# Altium PCB sk-am62-package-placement.PcbDoc
Units mm, origin at the board's own origin, x right, y up, seen from the top; angles counter-clockwise.
Board outline 22.86 x 24.13 mm, 2 copper layers (Top, Bottom), stack 0 mm thick; 2 components, 302 nets, 425 pads, 0 vias.
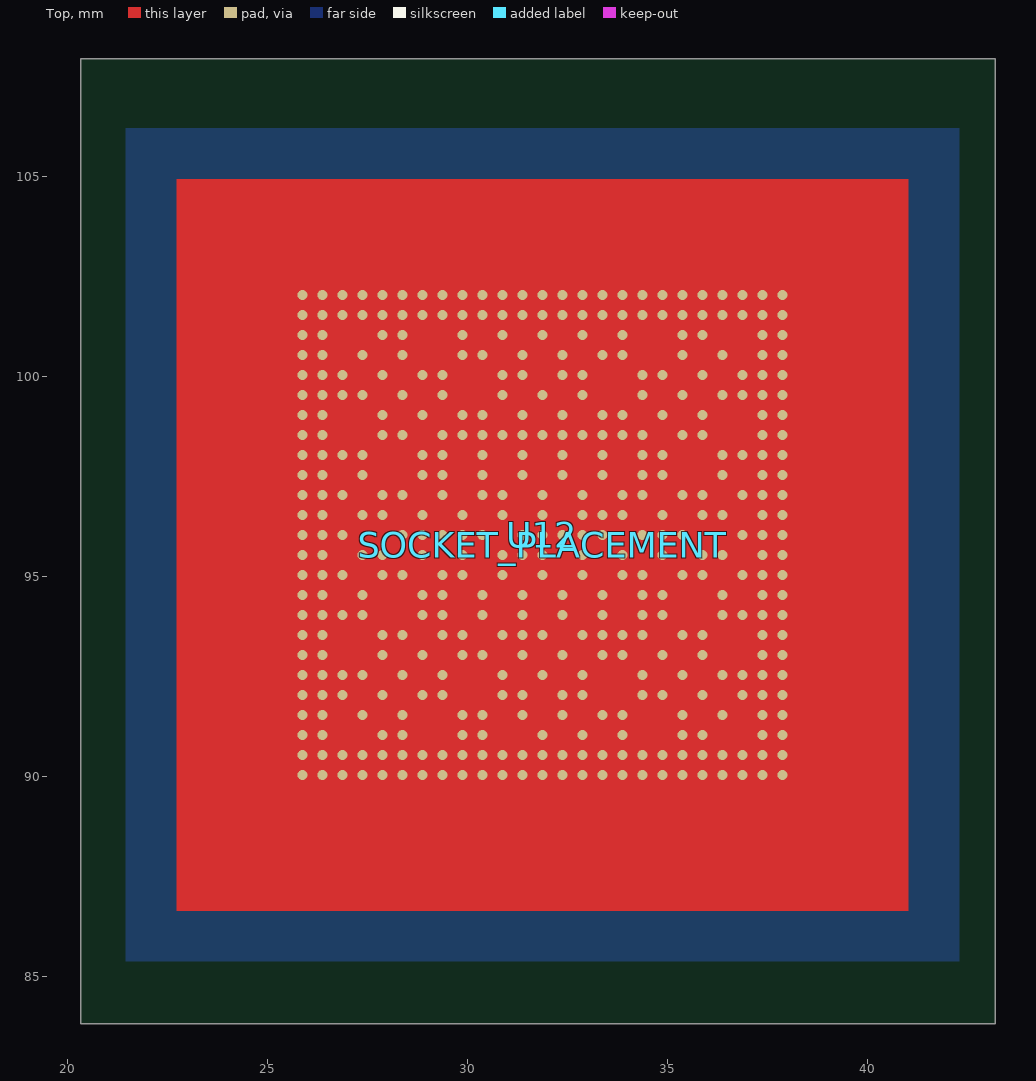
[diagram p0: Top view]
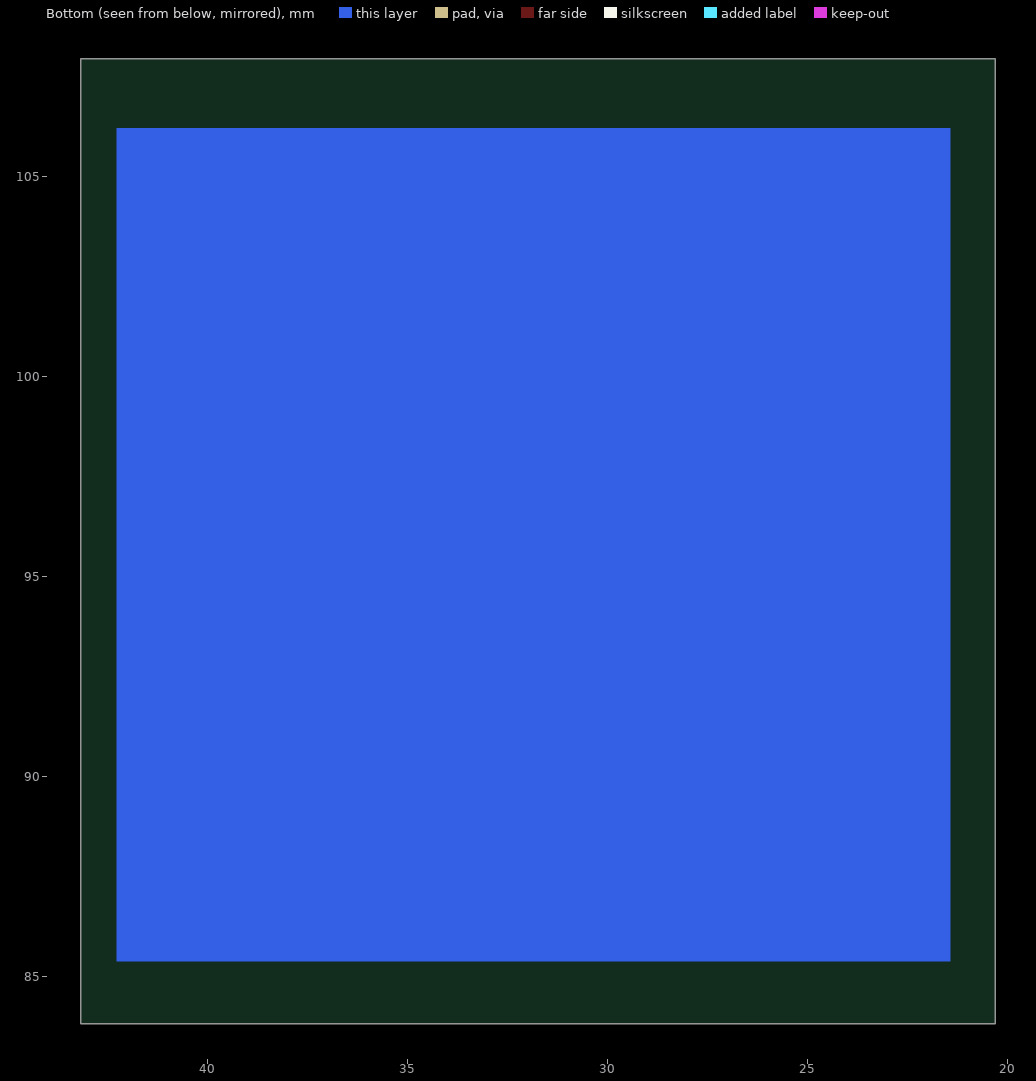
[diagram p1: Bottom view, seen from below]

## Layer stack, top to bottom

## Board outline
20.32,83.82 43.18,83.82 43.18,107.95 20.32,107.95

## Components (designator, comment, footprint, x,y, rotation, side; value= is the part's Value field where it differs from the comment)
SOCKET_PLACEMENT "" BGASKT425_C21135_720X720_9-7 31.863,95.798 r90 top
U12 "" BGA425_19-68_510X510_0-7 31.86,96.045 r90 top

## Footprints (in the part's own frame and the unit in brackets; to place one, negate y for a bottom-side part, rotate by r counter-clockwise, add the part's x,y. Pads: shape width x height; smd on the part's side, far side on the other; paste and mask are expansions set on the pad)
BGA425_19-68_510X510_0-7 [mil] "BGA425_19-68_510X510_0-7"
  round 10 smd: A1(-236.22,236.22) A2(-216.54,236.22) A3(-196.85,236.22) A4(-177.16,236.22) A5(-157.48,236.22) A6(-137.8,236.22) A7(-118.11,236.22) A8(-98.42,236.22) A9(-78.74,236.22) A10(-59.06,236.22) A11(-39.37,236.22) A12(-19.68,236.22) A13(0,236.22) A14(19.68,236.22) A15(39.37,236.22) A16(59.06,236.22) A17(78.74,236.22) A18(98.42,236.22) A19(118.11,236.22) A20(137.8,236.22) A21(157.48,236.22) A22(177.16,236.22) A23(196.85,236.22) A24(216.54,236.22) A25(236.22,236.22) AA1(-236.22,-157.48) AA2(-216.54,-157.48) AA3(-196.85,-157.48) AA5(-157.48,-157.48) AA7(-118.11,-157.48) AA8(-98.42,-157.48) AA11(-39.37,-157.48) AA12(-19.68,-157.48) AA14(19.68,-157.48) AA15(39.37,-157.48) AA18(98.42,-157.48) AA19(118.11,-157.48) AA21(157.48,-157.48) AA23(196.85,-157.48) AA24(216.54,-157.48) AA25(236.22,-157.48) AB1(-236.22,-177.16) AB2(-216.54,-177.16) AB4(-177.16,-177.16) AB6(-137.8,-177.16) AB9(-78.74,-177.16) AB10(-59.06,-177.16) AB12(-19.68,-177.16) AB14(19.68,-177.16) AB16(59.06,-177.16) AB17(78.74,-177.16) AB20(137.8,-177.16) AB22(177.16,-177.16) AB24(216.54,-177.16) AB25(236.22,-177.16) AC1(-236.22,-196.85) AC2(-216.54,-196.85) AC5(-157.48,-196.85) AC6(-137.8,-196.85) AC9(-78.74,-196.85) AC11(-39.37,-196.85) AC13(0,-196.85) AC15(39.37,-196.85) AC17(78.74,-196.85) AC20(137.8,-196.85) AC21(157.48,-196.85) AC24(216.54,-196.85) AC25(236.22,-196.85) AD1(-236.22,-216.54) AD2(-216.54,-216.54) AD3(-196.85,-216.54) AD4(-177.16,-216.54) AD5(-157.48,-216.54) AD6(-137.8,-216.54) AD7(-118.11,-216.54) AD8(-98.42,-216.54) AD9(-78.74,-216.54) AD10(-59.06,-216.54) AD11(-39.37,-216.54) AD12(-19.68,-216.54) AD13(0,-216.54) AD14(19.68,-216.54) AD15(39.37,-216.54) AD16(59.06,-216.54) AD17(78.74,-216.54) AD18(98.42,-216.54) AD19(118.11,-216.54) AD20(137.8,-216.54) AD21(157.48,-216.54) AD22(177.16,-216.54) AD23(196.85,-216.54) AD24(216.54,-216.54) AD25(236.22,-216.54) AE1(-236.22,-236.22) AE2(-216.54,-236.22) AE3(-196.85,-236.22) AE4(-177.16,-236.22) AE5(-157.48,-236.22) AE6(-137.8,-236.22) AE7(-118.11,-236.22) AE8(-98.42,-236.22) AE9(-78.74,-236.22) AE10(-59.06,-236.22) AE11(-39.37,-236.22) AE12(-19.68,-236.22) AE13(0,-236.22) AE14(19.68,-236.22) AE15(39.37,-236.22) AE16(59.06,-236.22) AE17(78.74,-236.22) AE18(98.42,-236.22) AE19(118.11,-236.22) AE20(137.8,-236.22) AE21(157.48,-236.22) AE22(177.16,-236.22) AE23(196.85,-236.22) AE24(216.54,-236.22) AE25(236.22,-236.22) B1(-236.22,216.54) B2(-216.54,216.54) B3(-196.85,216.54) B4(-177.16,216.54) B5(-157.48,216.54) B6(-137.8,216.54) B7(-118.11,216.54) B8(-98.42,216.54) B9(-78.74,216.54) B10(-59.06,216.54) B11(-39.37,216.54) B12(-19.68,216.54) B13(0,216.54) B14(19.68,216.54) B15(39.37,216.54) B16(59.06,216.54) B17(78.74,216.54) B18(98.42,216.54) B19(118.11,216.54) B20(137.8,216.54) B21(157.48,216.54) B22(177.16,216.54) B23(196.85,216.54) B24(216.54,216.54) B25(236.22,216.54) C1(-236.22,196.85) C2(-216.54,196.85) C5(-157.48,196.85) C6(-137.8,196.85) C9(-78.74,196.85) C11(-39.37,196.85) C13(0,196.85) C15(39.37,196.85) C17(78.74,196.85) C20(137.8,196.85) C21(157.48,196.85) C24(216.54,196.85) C25(236.22,196.85) D1(-236.22,177.16) D2(-216.54,177.16) D4(-177.16,177.16) D6(-137.8,177.16) D9(-78.74,177.16) D10(-59.06,177.16) D12(-19.68,177.16) D14(19.68,177.16) D16(59.06,177.16) D17(78.74,177.16) D20(137.8,177.16) D22(177.16,177.16) D24(216.54,177.16) D25(236.22,177.16) E1(-236.22,157.48) E2(-216.54,157.48) E3(-196.85,157.48) E5(-157.48,157.48) E7(-118.11,157.48) E8(-98.42,157.48) E11(-39.37,157.48) E12(-19.68,157.48) E14(19.68,157.48) E15(39.37,157.48) E18(98.42,157.48) E19(118.11,157.48) E21(157.48,157.48) E23(196.85,157.48) E24(216.54,157.48) E25(236.22,157.48) F1(-236.22,137.8) F2(-216.54,137.8) F3(-196.85,137.8) F4(-177.16,137.8) F6(-137.8,137.8) F8(-98.42,137.8) F11(-39.37,137.8) F13(0,137.8) F15(39.37,137.8) F18(98.42,137.8) F20(137.8,137.8) F22(177.16,137.8) F23(196.85,137.8) F24(216.54,137.8) F25(236.22,137.8) G1(-236.22,118.11) G2(-216.54,118.11) G5(-157.48,118.11) G7(-118.11,118.11) G9(-78.74,118.11) G10(-59.06,118.11) G12(-19.68,118.11) G13(0,118.11) G14(19.68,118.11) G16(59.06,118.11) G17(78.74,118.11) G19(118.11,118.11) G21(157.48,118.11) G24(216.54,118.11) G25(236.22,118.11) H1(-236.22,98.42) H2(-216.54,98.42) H5(-157.48,98.42) H6(-137.8,98.42) H8(-98.42,98.42) H9(-78.74,98.42) H10(-59.06,98.42) H11(-39.37,98.42) H13(0,98.42) H15(39.37,98.42) H16(59.06,98.42) H17(78.74,98.42) H18(98.42,98.42) H20(137.8,98.42) H21(157.48,98.42) H24(216.54,98.42) H25(236.22,98.42) J1(-236.22,78.74) J2(-216.54,78.74) J3(-196.85,78.74) J4(-177.16,78.74) J7(-118.11,78.74) J8(-98.42,78.74) J11(-39.37,78.74) J12(-19.68,78.74) J13(0,78.74) J14(19.68,78.74) J18(98.42,78.74) J19(118.11,78.74) J22(177.16,78.74) J23(196.85,78.74) J24(216.54,78.74) J25(236.22,78.74) K1(-236.22,59.06) K2(-216.54,59.06) K3(-196.85,59.06) K4(-177.16,59.06) K7(-118.11,59.06) K9(-78.74,59.06) K10(-59.06,59.06) K13(0,59.06) K15(39.37,59.06) K16(59.06,59.06) K17(78.74,59.06) K18(98.42,59.06) K19(118.11,59.06) K22(177.16,59.06) K24(216.54,59.06) K25(236.22,59.06) L1(-236.22,39.37) L2(-216.54,39.37) L5(-157.48,39.37) L6(-137.8,39.37) L8(-98.42,39.37) L11(-39.37,39.37) L12(-19.68,39.37) L14(19.68,39.37) L15(39.37,39.37) L18(98.42,39.37) L20(137.8,39.37) L21(157.48,39.37) L23(196.85,39.37) L24(216.54,39.37) L25(236.22,39.37) M1(-236.22,19.68) M2(-216.54,19.68) M4(-177.16,19.68) M5(-157.48,19.68) M7(-118.11,19.68) M8(-98.42,19.68) M9(-78.74,19.68) M10(-59.06,19.68) M12(-19.68,19.68) M13(0,19.68) M16(59.06,19.68) M17(78.74,19.68) M18(98.42,19.68) M19(118.11,19.68) M21(157.48,19.68) M22(177.16,19.68) M24(216.54,19.68) M25(236.22,19.68) N1(-236.22,0) N2(-216.54,0) N3(-196.85,0) N6(-137.8,0) N8(-98.42,0) N11(-39.37,0) N12(-19.68,0) N13(0,0) N14(19.68,0) N15(39.37,0) N18(98.42,0) N20(137.8,0) N23(196.85,0) N24(216.54,0) N25(236.22,0) P1(-236.22,-19.68) P2(-216.54,-19.68) P4(-177.16,-19.68) P5(-157.48,-19.68) P7(-118.11,-19.68) P9(-78.74,-19.68) P10(-59.06,-19.68) P13(0,-19.68) P16(59.06,-19.68) P17(78.74,-19.68) P18(98.42,-19.68) P19(118.11,-19.68) P21(157.48,-19.68) P22(177.16,-19.68) P24(216.54,-19.68) P25(236.22,-19.68) R1(-236.22,-39.37) R2(-216.54,-39.37) R3(-196.85,-39.37) R5(-157.48,-39.37) R6(-137.8,-39.37) R8(-98.42,-39.37) R11(-39.37,-39.37) R12(-19.68,-39.37) R13(0,-39.37) R14(19.68,-39.37) R15(39.37,-39.37) R18(98.42,-39.37) R20(137.8,-39.37) R21(157.48,-39.37) R23(196.85,-39.37) R24(216.54,-39.37) R25(236.22,-39.37) T1(-236.22,-59.06) T2(-216.54,-59.06) T4(-177.16,-59.06) T7(-118.11,-59.06) T8(-98.42,-59.06) T9(-78.74,-59.06) T10(-59.06,-59.06) T13(0,-59.06) T14(19.68,-59.06) T16(59.06,-59.06) T17(78.74,-59.06) T18(98.42,-59.06) T19(118.11,-59.06) T22(177.16,-59.06) T24(216.54,-59.06) T25(236.22,-59.06) U1(-236.22,-78.74) U2(-216.54,-78.74) U3(-196.85,-78.74) U4(-177.16,-78.74) U7(-118.11,-78.74) U8(-98.42,-78.74) U11(-39.37,-78.74) U12(-19.68,-78.74) U14(19.68,-78.74) U15(39.37,-78.74) U18(98.42,-78.74) U19(118.11,-78.74) U22(177.16,-78.74) U23(196.85,-78.74) U24(216.54,-78.74) U25(236.22,-78.74) V1(-236.22,-98.42) V2(-216.54,-98.42) V5(-157.48,-98.42) V6(-137.8,-98.42) V8(-98.42,-98.42) V9(-78.74,-98.42) V10(-59.06,-98.42) V11(-39.37,-98.42) V13(0,-98.42) V15(39.37,-98.42) V16(59.06,-98.42) V17(78.74,-98.42) V18(98.42,-98.42) V20(137.8,-98.42) V21(157.48,-98.42) V24(216.54,-98.42) V25(236.22,-98.42) W1(-236.22,-118.11) W2(-216.54,-118.11) W5(-157.48,-118.11) W7(-118.11,-118.11) W9(-78.74,-118.11) W10(-59.06,-118.11) W12(-19.68,-118.11) W13(0,-118.11) W14(19.68,-118.11) W16(59.06,-118.11) W17(78.74,-118.11) W19(118.11,-118.11) W21(157.48,-118.11) W24(216.54,-118.11) W25(236.22,-118.11) Y1(-236.22,-137.8) Y2(-216.54,-137.8) Y3(-196.85,-137.8) Y4(-177.16,-137.8) Y6(-137.8,-137.8) Y8(-98.42,-137.8) Y11(-39.37,-137.8) Y13(0,-137.8) Y15(39.37,-137.8) Y18(98.42,-137.8) Y20(137.8,-137.8) Y22(177.16,-137.8) Y23(196.85,-137.8) Y24(216.54,-137.8) Y25(236.22,-137.8)
BGASKT425_C21135_720X720_9-7 [mm] "BGASKT425_C21135_720X720_9-7"
  Top region: -9.144,9.144 -9.144,-9.144 9.144,-9.144 9.144,9.144
  Bottom region: -10.414,10.414 -10.414,-10.414 10.414,-10.414 10.414,10.414

## Nets (pads, with @x,y where several pads share a name; then routed paths per layer and width w, separated by ;. In a path a pad name is that pad's centre, name@x,y a point inside that pad or via, vN(x,y) a via of type N, cw(c..) or ccw(c..) an arc to the next point about the centre after c; other vN are vias at no path point)
BT_EN_SOC: U12.E8
CAP_VDDS0: U12.H15
CAP_VDDS1: U12.K18
CAP_VDDS2: U12.W17
CAP_VDDS3: U12.P19
CAP_VDDS4: U12.U7
CAP_VDDS5: U12.H17
CAP_VDDS6: U12.J19
CAP_VDDS_CANUART: U12.G9
CAP_VDDS_MCU: U12.H11
CH1_LVDS_A0N: U12.AA5
CH1_LVDS_A0P: U12.Y6
CH1_LVDS_A1N: U12.AD3
CH1_LVDS_A1P: U12.AB4
CH1_LVDS_A2N: U12.Y8
CH1_LVDS_A2P: U12.AA8
CH1_LVDS_A3N: U12.AB6
CH1_LVDS_A3P: U12.AA7
CH1_LVDS_CLKN: U12.AD4
CH1_LVDS_CLKP: U12.AE3
CH2_LVDS_A0N: U12.AC6
CH2_LVDS_A0P: U12.AC5
CH2_LVDS_A1N: U12.AE5
CH2_LVDS_A1P: U12.AD6
CH2_LVDS_A2N: U12.AE6
CH2_LVDS_A2P: U12.AD7
CH2_LVDS_A3N: U12.AD8
CH2_LVDS_A3P: U12.AE7
CH2_LVDS_CLKN: U12.AE4
CH2_LVDS_CLKP: U12.AD5
CPSW_RGMII1_RD0: U12.AB17
CPSW_RGMII1_RD1: U12.AC17
CPSW_RGMII1_RD2: U12.AB16
CPSW_RGMII1_RD3: U12.AA15
CPSW_RGMII1_RX_CTL: U12.AE17
CPSW_RGMII1_RXC: U12.AD17
CPSW_RGMII1_TD0: U12.AE20
CPSW_RGMII1_TD1: U12.AD20
CPSW_RGMII1_TD2: U12.AE18
CPSW_RGMII1_TD3: U12.AD18
CPSW_RGMII1_TX_CTL: U12.AD19
CPSW_RGMII2_RD0: U12.AE23
CPSW_RGMII2_RD1: U12.AB20
CPSW_RGMII2_RD2: U12.AC21
CPSW_RGMII2_RD3: U12.AE22
CPSW_RGMII2_RX_CTL: U12.AD22
CPSW_RGMII2_RXC: U12.AD23
CPSW_RGMII2_TD0: U12.Y18
CPSW_RGMII2_TD1: U12.AA18
CPSW_RGMII2_TD2: U12.AD21
CPSW_RGMII2_TD3: U12.AC20
CPSW_RGMII2_TX_CTL: U12.AA19
CPSW_RGMII_INTN/PRU_INTN: U12.D16
CSI0_RXCLKN: U12.AD15
CSI0_RXCLKP: U12.AE15
CSI0_RXN0: U12.AB14
CSI0_RXN1: U12.AD14
CSI0_RXP0: U12.AC15
CSI0_RXP1: U12.AE14
DDR_A0: U12.J1
DDR_A1: U12.J2
DDR_A2: U12.K3
DDR_A3: U12.L5
DDR_A4: U12.K4
DDR_A5: U12.K1
DDR_A6: U12.R2
DDR_A7: U12.P2
DDR_A8: U12.P1
DDR_A9: U12.P4
DDR_A10: U12.R5
DDR_A11: U12.P5
DDR_A12: U12.R6
DDR_A13: U12.R1
DDR_A14_WEN: U12.N3
DDR_A15_CAS: U12.M4
DDR_A16_RAS: U12.M5
DDR_ACTN: U12.N6
DDR_ALERTN: U12.R3
DDR_BA0: U12.M1
DDR_BA1: U12.N1
DDR_BG0: U12.T4
DDR_CKE: U12.H2
DDR_CLKN: U12.L2
DDR_CLKP: U12.L1
DDR_CSN: U12.L6
DDR_DQ0: U12.F4
DDR_DQ1: U12.H6
DDR_DQ2: U12.E3
DDR_DQ3: U12.F3
DDR_DQ4: U12.F1
DDR_DQ5: U12.G5
DDR_DQ6: U12.G2
DDR_DQ7: U12.F2
DDR_DQ8: U12.U1
DDR_DQ9: U12.U3
DDR_DQ10: U12.U2
DDR_DQ11: U12.V5
DDR_DQ12: U12.W2
DDR_DQ13: U12.V6
DDR_DQ14: U12.Y1
DDR_DQ15: U12.W1
DDR_LDM: U12.H5
DDR_LDQS_N: U12.E2
DDR_LDQS_P: U12.E1
DDR_ODT: U12.H1
DDR_PARITY: U12.T1
DDR_RESET#: U12.G1
DDR_UDM: U12.W5
DDR_UDQS_N: U12.V2
DDR_UDQS_P: U12.V1
DGND: U12.A1 U12.A24 U12.A25 U12.AA11 U12.AB9 U12.AD1 U12.AD9 U12.AD12 U12.AD16 U12.AD25 U12.AE1 U12.AE8 U12.AE12 U12.AE16 U12.AE24 U12.AE25 U12.B25 U12.F13 U12.G13 U12.G19 U12.H13 U12.H16 U12.H18 U12.H20 U12.J7 U12.J13 U12.K7 U12.K13 U12.K15 U12.K19 U12.L20 U12.M7 U12.M8 U12.M10 U12.M12 U12.M13 U12.M17 U12.M18 U12.N15 U12.P7 U12.P10 U12.P13 U12.R13 U12.R15 U12.R18 U12.R20 U12.T8 U12.T13 U12.T14 U12.T16 U12.T17 U12.T18 U12.U8 U12.U19 U12.V9 U12.V10 U12.V11 U12.V13 U12.V16 U12.V18 U12.W7 U12.Y2
EXP_EHRPWM1_B: U12.E18
EXP_GPIO0_14_LT: U12.E24
EXP_GPIO0_33: U12.L24
EXP_GPIO0_36: U12.N20
EXP_GPIO0_38: U12.V25
EXP_GPIO0_39: U12.K25
EXP_GPIO0_40/PR0_ECAP0_IN_APWM_: U12.M22
EXP_GPIO0_41: U12.M21
EXP_GPIO0_42: U12.L21
EXP_GPIO1_22: U12.A15
EXP_SPI0_CLK: U12.A14
EXP_SPI0_CS0: U12.A13
EXP_SPI0_CS1: U12.C13
EXP_SPI0_D0: U12.B13
EXP_SPI0_D1: U12.B14
EXP_SPI2_CS1: U12.B20
EXP_SPI2_CS2: U12.B18
EXP_UART5_RXD: U12.C15
EXP_UART5_TXD: U12.E15
EXT_CLKOUT0_R: U12.A18
GPIO1_23_INTN: U12.B15
GPIO_OSPI_RSTN: U12.G21
HFOSC0_CLKOUT_32K: U12.A12
MCU_GPIO0_15: U12.E5
MCU_GPIO0_16: U12.D4
MCU_I2C0_SCL: U12.A8
MCU_I2C0_SDA: U12.D10
MCU_MCAN0_RX: U12.B3
MCU_MCAN0_TX: U12.D6
MCU_OSC0_XI: U12.B2
MCU_OSC0_XO: U12.A3
MCU_PORZ: U12.D2
MCU_RESETSTATZ: U12.B12
MCU_RESETZ: U12.E11
MCU_SAFETY_ERRORZ_1V8: U12.D1
MCU_SPI0_CLK: U12.A7
MCU_SPI0_CS1: U12.B8
MCU_SPI0_D0: U12.D9
MCU_SPI0_D1: U12.C9
MCU_UART0_CTS: U12.A6
MCU_UART0_RTS: U12.B6
MCU_UART0_RXD: U12.B5
MCU_UART0_TXD: U12.A5
MMC1_CLK_R: U12.B22
MMC1_CMD: U12.A21
MMC1_D0: U12.A22
MMC1_D1: U12.B21
MMC1_D2: U12.C21
MMC1_D3: U12.D22
MMC1_SDCD: U12.D17
MMC2_CMD: U12.C24
MMC2_D0: U12.B24
MMC2_D1: U12.C25
MMC2_D2: U12.E23
MMC2_D3: U12.D24
N16887346: U12.M2
N16925380: U12.AA14
N16944070: U12.AE19
N16944341: U12.AE21
N16956470: U12.G25
N17030548: U12.D12
N17395932: U12.B9
N19066697: U12.M24
N19066711: U12.U23
N19066744: U12.L25
N19880817: U12.AC9
N19880821: U12.AE10
N20055845: U12.L23
N20190775: U12.D20
OSPI0_CSN0: U12.F23
OSPI_CLK: U12.H24
OSPI_DQS_SOC: U12.J24
OSPI_INTN: U12.H21
PMIC_STBY: U12.B7
PORZ_OUT: U12.E21
PR0_PRU0_GPO0: U12.M25
PR0_PRU0_GPO1: U12.N23
PR0_PRU0_GPO2: U12.N24
PR0_PRU0_GPO3: U12.N25
PR0_PRU0_GPO4: U12.P24
PR0_PRU0_GPO5: U12.P22
PR0_PRU0_GPO6: U12.P21
PR0_PRU0_GPO7: U12.R23
RESETSTATZ: U12.F22
SOC_DVDD1V8: U12.G10 U12.J18 U12.L18 U12.M19 U12.T7
SOC_DVDD3V3: U12.F11 U12.F15 U12.G12 U12.G14 U12.H9 U12.K10 U12.N18 U12.P18 U12.T19 U12.U18 U12.W16 U12.W19 U12.Y13
SOC_EMU0: U12.E12
SOC_EMU1: U12.C11
SOC_GPIO1_49: U12.C17
SOC_I2C0_SCL: U12.B16
SOC_I2C0_SDA: U12.A16
SOC_I2C1_SCL: U12.B17
SOC_I2C1_SDA: U12.A17
SOC_I2C2_SCL: U12.K22
SOC_I2C2_SDA: U12.K24
SOC_MMC0_CLK: U12.AB1
SOC_MMC0_CMD: U12.Y3
SOC_MMC0_DAT0: U12.AA2
SOC_MMC0_DAT1: U12.AA1
SOC_MMC0_DAT2: U12.AA3
SOC_MMC0_DAT3: U12.Y4
SOC_MMC0_DAT4: U12.AB2
SOC_MMC0_DAT5: U12.AC1
SOC_MMC0_DAT6: U12.AD2
SOC_MMC0_DAT7: U12.AC2
SOC_MMC2_CLK: U12.D25
SOC_OSPI_DQ0: U12.E25
SOC_OSPI_DQ1: U12.G24
SOC_OSPI_DQ2: U12.F25
SOC_OSPI_DQ3: U12.F24
SOC_OSPI_DQ4: U12.J23
SOC_OSPI_DQ5: U12.J25
SOC_OSPI_DQ6: U12.H25
SOC_OSPI_DQ7: U12.J22
SOC_RGMII_MDC: U12.AD24
SOC_RGMII_MDIO: U12.AB22
SOC_SPI2_CLK: U12.A20
SOC_SPI2_CS0: U12.E19
SOC_SPI2_D0: U12.B19
SOC_SPI2_D1: U12.A19
SOC_TCK: U12.A10
SOC_TDI: U12.A11
SOC_TMS: U12.B11
SOC_TRST#: U12.B10
SOC_UART0_RX_3V3: U12.D14
SOC_UART0_TX_3V3: U12.E14
SOC_USB0_DM: U12.AE11
SOC_USB0_DP: U12.AD11
SOC_USB0_DRVVBUS: U12.C20
SOC_USB0_VBUS: U12.AC11
SOC_USB1_DM: U12.AD10
SOC_USB1_DP: U12.AE9
SOC_USB1_DRVVBUS: U12.F18
SOC_USB1_VBUS: U12.AB10
SOC_VDDSHV5_SDIO: U12.G17
SOC_VOUT0_DATA0: U12.U22
SOC_VOUT0_DATA1: U12.V24
SOC_VOUT0_DATA2: U12.W25
SOC_VOUT0_DATA3: U12.W24
SOC_VOUT0_DATA4: U12.Y25
SOC_VOUT0_DATA5: U12.Y24
SOC_VOUT0_DATA6: U12.Y23
SOC_VOUT0_DATA7: U12.AA25
SOC_VOUT0_DATA8: U12.V21
SOC_VOUT0_DATA9: U12.W21
SOC_VOUT0_DATA10: U12.V20
SOC_VOUT0_DATA11: U12.AA23
SOC_VOUT0_DATA12: U12.AB25
SOC_VOUT0_DATA13: U12.AA24
SOC_VOUT0_DATA14: U12.Y22
SOC_VOUT0_DATA15: U12.AA21
SOC_VOUT0_DATA16: U12.R24
SOC_VOUT0_DATA17: U12.R25
SOC_VOUT0_DATA18: U12.T25
SOC_VOUT0_DATA19: U12.R21
SOC_VOUT0_DATA20: U12.T22
SOC_VOUT0_DATA21: U12.T24
SOC_VOUT0_DATA22: U12.U25
SOC_VOUT0_DATA23: U12.U24
SOC_VOUT0_DE: U12.Y20
SOC_VOUT0_HSYNC: U12.AB24
SOC_VOUT0_PCLK: U12.AC24
SOC_VOUT0_VSYNC: U12.AC25
SOC_WARM_RESETZ: U12.F20
TEMP_DIODE_P: U12.E7
VDD_CANUART: U12.F8
VDD_CORE: U12.H8 U12.J11 U12.J14 U12.K17 U12.L12 U12.L15 U12.M16 U12.N8 U12.N11 U12.N13 U12.P17 U12.R11 U12.R14 U12.U12 U12.V8 U12.V15 U12.V17
VDD_DDR4: U12.K9 U12.L8 U12.M9 U12.P9 U12.R8
VDDA_1V8: U12.G7 U12.G16 U12.T9
VDDA_1V8_CSIRX: U12.W14
VDDA_1V8_MCU: U12.L11
VDDA_1V8_OLDI: U12.W9 U12.W10
VDDA_1V8_USB: U12.Y11
VDDA_CORE_CSI: U12.W13
VDDA_CORE_USB: U12.W12
VDDA_PLL0: U12.U11
VDDA_PLL1: U12.U15
VDDA_PLL2: U12.L14
VDDA_SYS_MON: U12.H10
VDDR_CORE: U12.J12 U12.K16 U12.N12 U12.N14 U12.P16 U12.R12 U12.T10 U12.U14
VPP_1V8: U12.J8
VSEL_SD: U12.P25
WKUP_I2C0_SDA: U12.A9
WKUP_LFOSCO_XI: U12.C2
WKUP_LFOSCO_XO: U12.C1
WKUP_UART0_CTS_3V3: U12.C6
WKUP_UART0_RTS_3V3: U12.A4
WKUP_UART0_RX_3V3: U12.B4
WKUP_UART0_TX_3V3: U12.C5
WLAN_EN: U12.A23
WLAN_IRQ: U12.B23
pads on no net: U12.A2 U12.AA12 U12.AB12 U12.AC13 U12.AD13 U12.AE2 U12.AE13 U12.B1 U12.F6 U12.J3 U12.J4 U12.K2 U12.N2 U12.T2 U12.U4 U12.Y15

## Other copper
Bottom:
  region: 67.297,18.058 67.297,17.826 ccw(c67.398,17.826) 67.398,17.726 67.518,17.726 ccw(c67.518,17.826) 67.618,17.826 67.618,18.247 67.487,18.247